# Altium PCB Half Bridge.PcbDoc
Units mm, origin at the board's own origin, x right, y up, seen from the top; angles counter-clockwise.
Board outline 30 x 30 mm, 2 copper layers (Top Layer, Bottom Layer), stack 1.5 mm thick; 8 components, 10 nets, 41 pads, 19 vias.
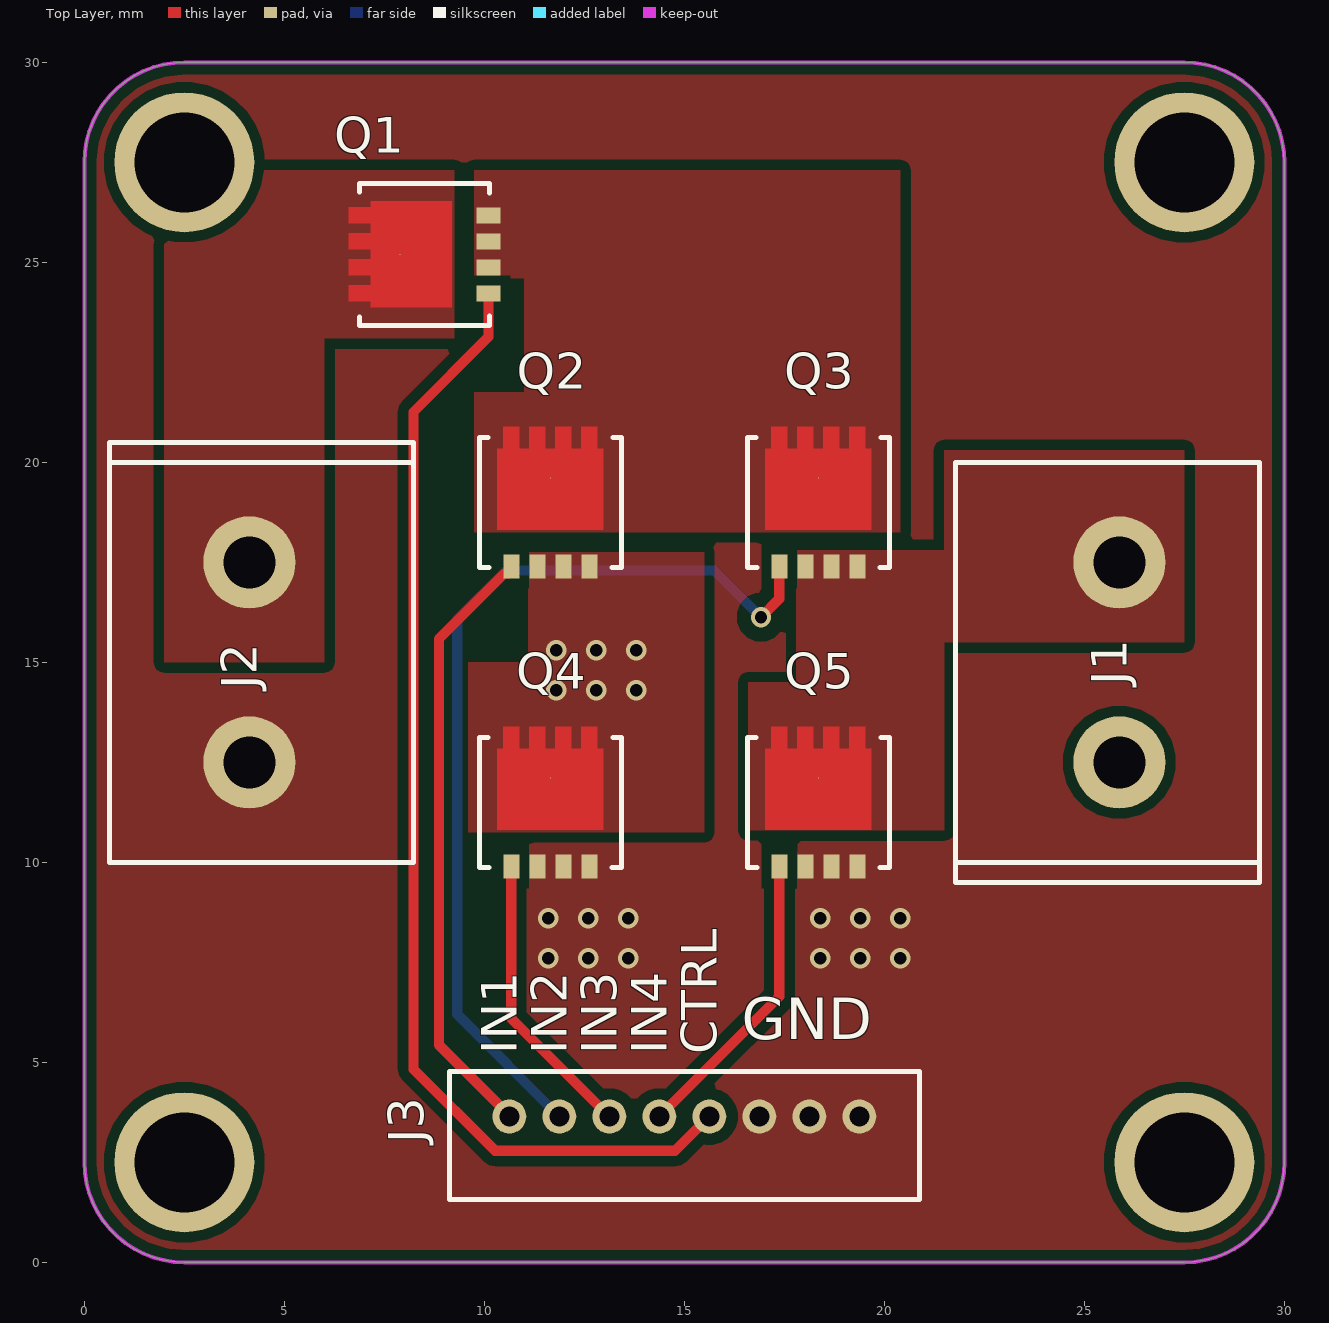
[diagram p0: Top Layer view]
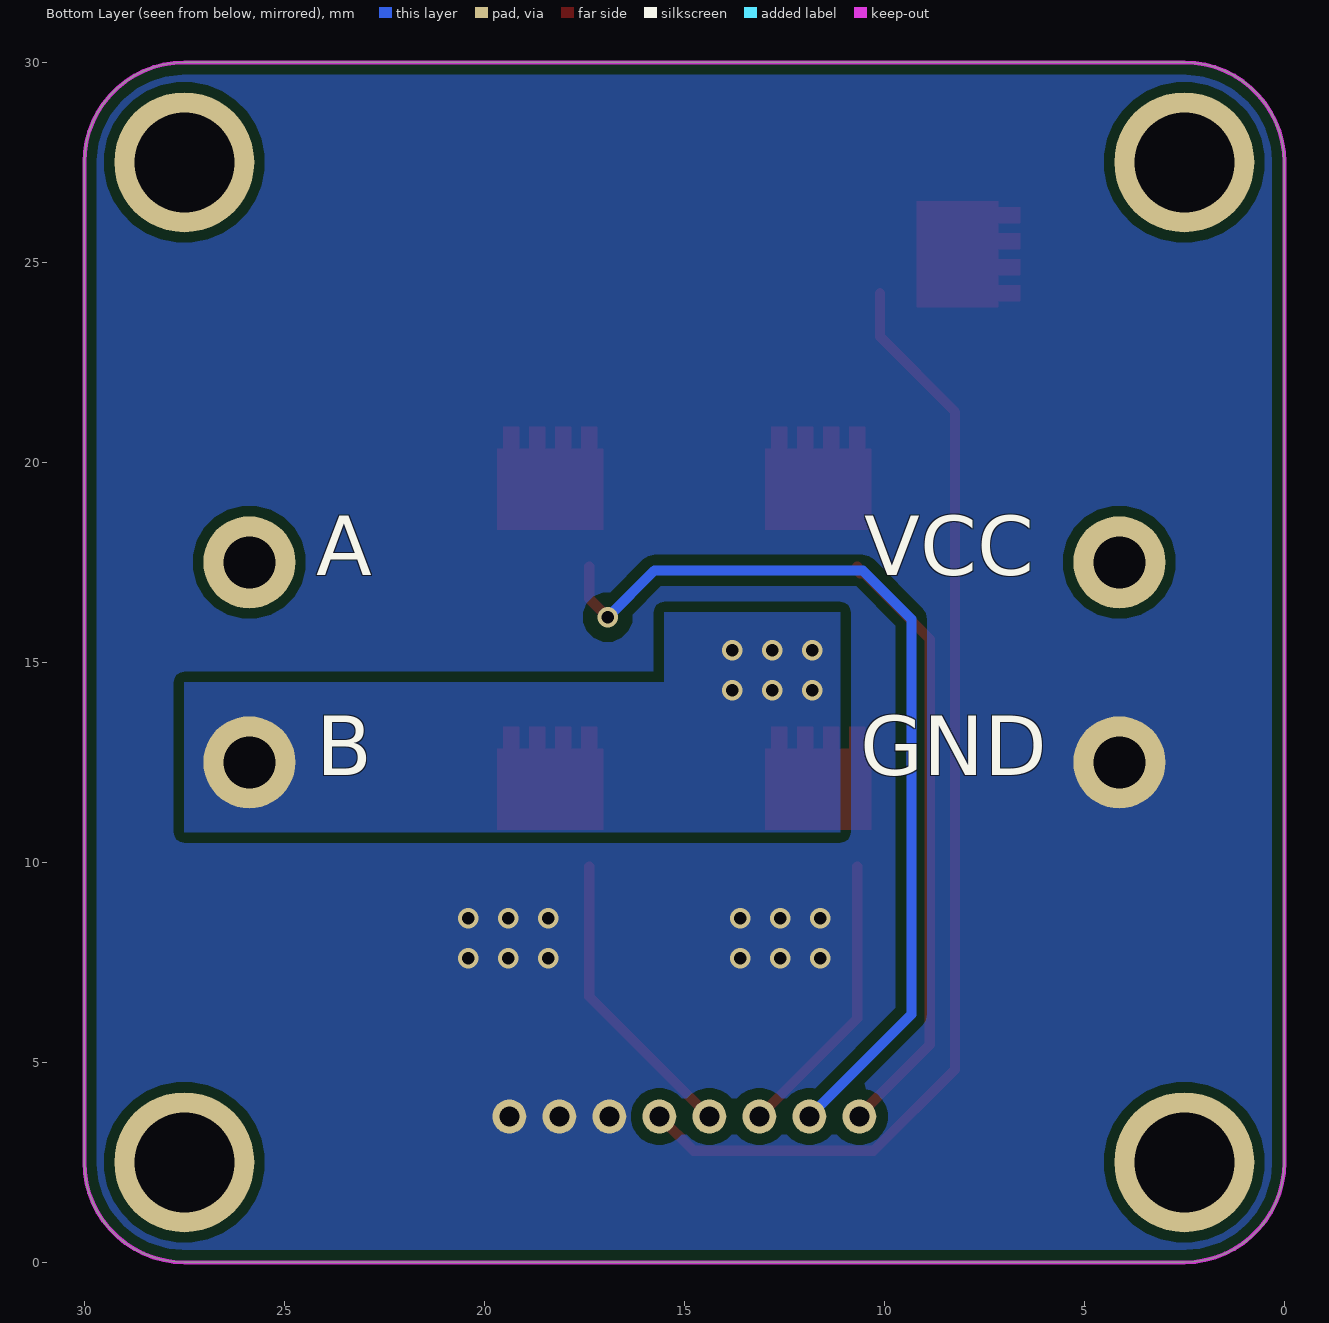
[diagram p1: Bottom Layer view, seen from below]
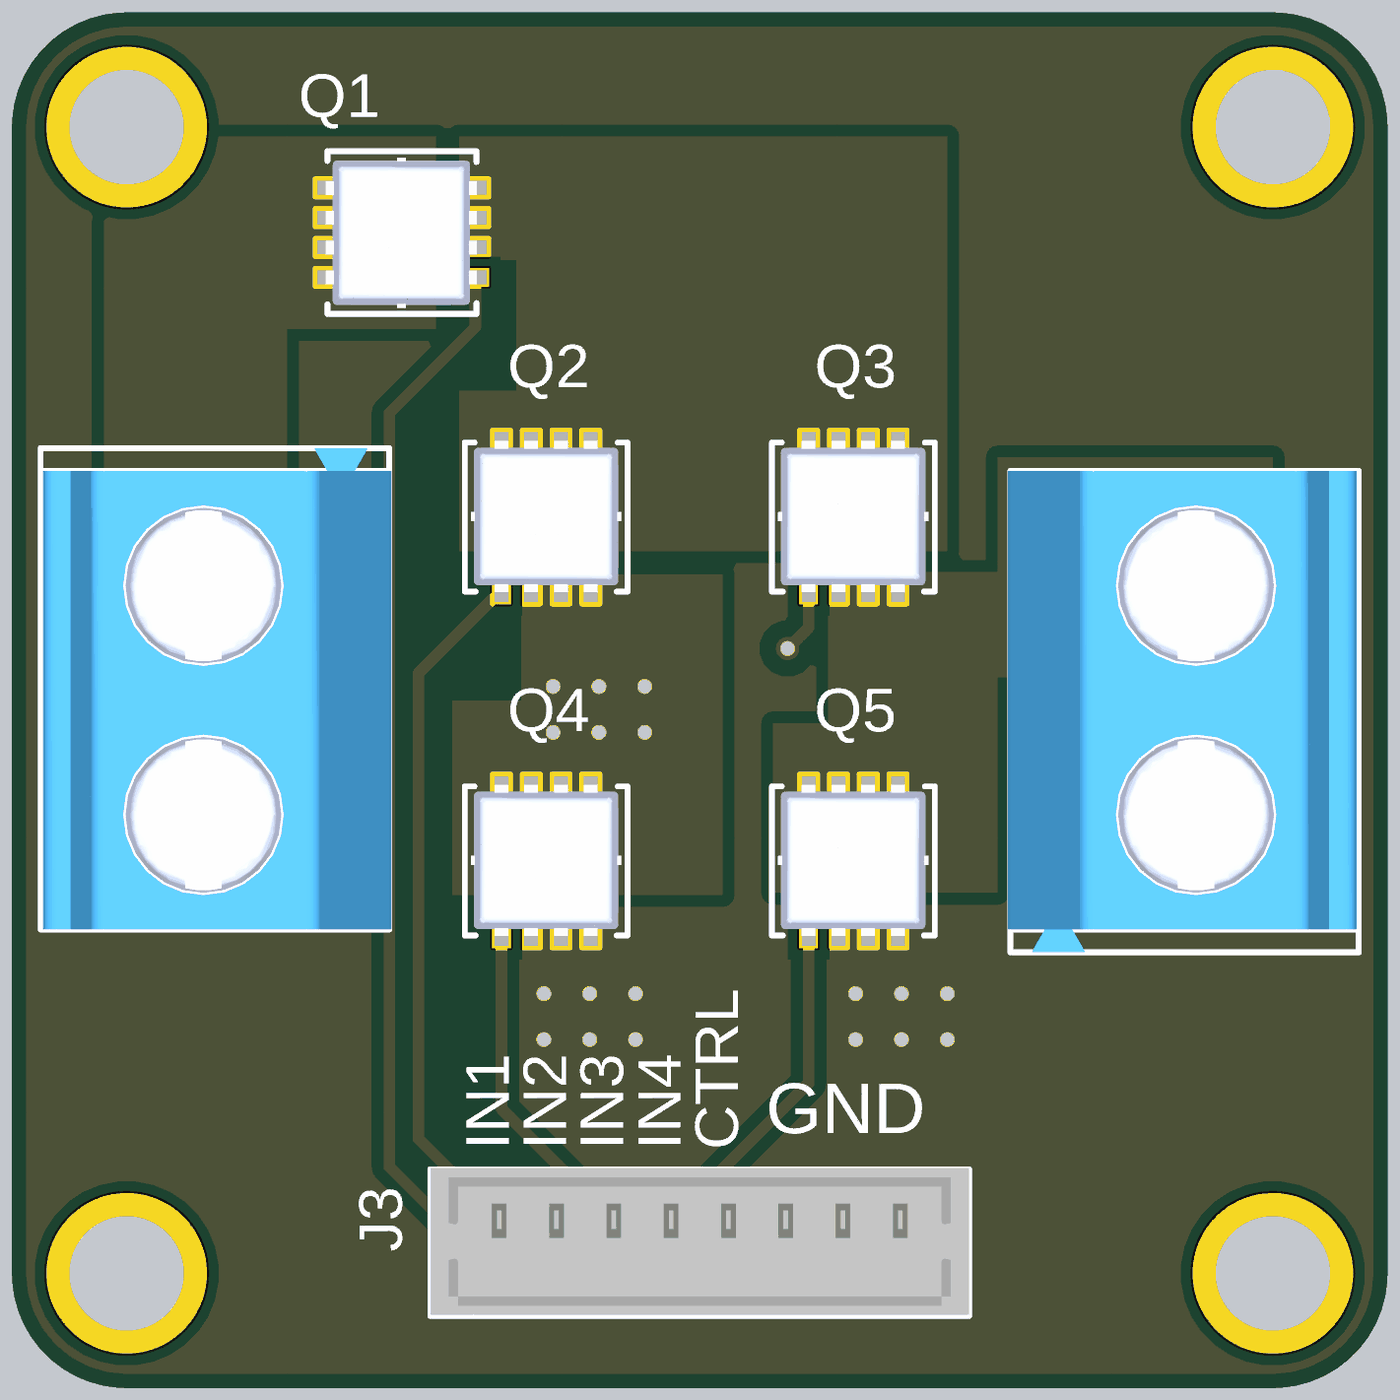
[diagram p2: 3D render of the assembled board from above, using the file's embedded part models]

## Layer stack, top to bottom
Top Solder: solder mask 0.0305, SM-001, Dk 3.8
Top Layer: signal copper 0.035
Dielectric 1: core 1.43, Core-043, Dk 4.6
Bottom Layer: signal copper 0.035
Bottom Solder: solder mask 0.0305, SM-001, Dk 3.8

## Board outline
0,2.5 0,27.5 cw(c2.5,27.5) 2.5,30 27.5,30 cw(c27.5,27.5) 30,27.5 30,2.5 cw(c27.5,2.5) 27.5,0 2.5,0 cw(c2.5,2.5)

## Design rules (kind name [scope] priority, off if disabled: settings)
BoardOutlineClearance [All] p1: gap=0.305 ignorepadtopadclearanceinfootprint=FALSE except(0: Arc-SplitContinuation Track-SplitContinuation SMDPad-SplitContinuation THPad-SplitContinuation Via-SplitContinuation Fill-SplitContinuation Poly-SplitContinuation Region-SplitContinuation Text-SplitContinuation)
Clearance [All] p1: gap=0.254 ignorepadtopadclearanceinfootprint=TRUE except(0.127: Arc-Arc Arc-Track Arc-SMDPad Track-Track Track-SMDPad; 0.152: Arc-Text Track-Text SMDPad-SMDPad SMDPad-Text THPad-Text Via-Text Fill-Text Poly-Text Region-Text Text-Text; 0.203: Arc-Via Track-Via SMDPad-Via Via-Via; 0.305: Arc-THPad Track-THPad SMDPad-THPad; 0.457: Arc-Hole Track-Hole SMDPad-Hole THPad-THPad THPad-Via THPad-Hole Via-Hole Fill-Hole Poly-Hole Region-Hole Text-Hole)
ComponentClearance [All] p1: gap=0.254 collisioncheckmode=3 verticalgap=0.254 showdistances=TRUE checkcomponentboundary=TRUE
HoleSize [All] p1: absolutevalues=TRUE maxlimit=6.299 minlimit=0.305 maxpercent=80.000 minpercent=20.000
HoleToHoleClearance [All] p1: gap=0.457 allowstackedmicrovias=TRUE
MinimumSolderMaskSliver [All] p1: minsoldermaskwidth=0.076
PolygonConnect [All] p1: connectstyle=Direct reliefconductorwidth=0.254 reliefentries=4 polygonreliefangle="45 Angle" airgapwidth=0.254
RoutingVias [All] p1: holewidth=0.381 width=0.584 viastyle="Through Hole" minholewidth=0.305 minwidth=0.508 maxholewidth=0.61 maxwidth=0.864
SilkToSilkClearance [All] p1: silktosilkclearance=0.152
SilkToSolderMaskClearance SilkscreenOverComponentPads [IsPad] p1: minsilkscreentomaskgap=0.152 clearancetoexposedcopper=FALSE
SolderMaskExpansion [All] p1: expansion=0.051 istentingtop=FALSE
UnRoutedNet [All] p1: checkbadconnections=TRUE
UnpouredPolygon [All] p1: allowunpoured=TRUE allowshelved=TRUE
Width [All] p1: maxlimit=25.4 minlimit=0.152 preferedwidth=0.203
22 further rules are at their usual default settings.

## Components (designator, comment, footprint, x,y, rotation, side; value= is the part's Value field where it differs from the comment)
J1 "TB002-500-02BE" TB002-500-02BE 25.875,15 r90 top locked
J2 "TB002-500-02BE" TB002-500-02BE 4.125,15 r270 top locked
J3 "530470810" 530470810 15,3.645 r0 top locked
Q1 "PXN017-30QL" NEXPERIA-MLPAK33 9,25.2 r90 top locked
Q2 "PXN017-30QL" NEXPERIA-MLPAK33 11.65,18.5 r0 top locked
Q3 "PXN017-30QL" NEXPERIA-MLPAK33 18.35,18.5 r0 top locked
Q4 "PXN017-30QL" NEXPERIA-MLPAK33 11.65,11 r0 top locked
Q5 "PXN017-30QL" NEXPERIA-MLPAK33 18.35,11 r0 top locked

## Footprints (in the part's own frame and the unit in brackets; to place one, negate y for a bottom-side part, rotate by r counter-clockwise, add the part's x,y. Pads: shape width x height; smd on the part's side, far side on the other; paste and mask are expansions set on the pad)
530470810 [mm] "Connector Header Through Hole 8 position 0.049\" (1.25mm)"
  round 0.85 hole 0.5: 1(-4.375,0) 2(-3.125,0) 3(-1.875,0) 4(-0.625,0) 5(0.625,0) 6(1.875,0) 7(3.125,0) 8(4.375,0)
  silkscreen extent -5.87,-2.07 5.88,1.12, body extent -5.87,-2.05 5.87,1.15, height 4.22
NEXPERIA-MLPAK33 [mm] "SOT8002-1"
  round 0.025 smd paste-2539.97 mask+0.05: D(0,1.105)
  rect 0.4x0.6 smd paste-0.05 mask+0.05: G(-0.975,-1.105) S(-0.325,-1.105) S(0.325,-1.105) S(0.975,-1.105)
  Top Layer region: -1.325,1.845 -1.175,1.845 -1.175,2.395 -0.775,2.395 -0.775,1.845 -0.525,1.845 -0.525,2.395 -0.125,2.395 -0.125,1.845 0.125,1.845 0.125,2.395 0.525,2.395 0.525,1.845 0.775,1.845 0.775,2.395 1.175,2.395 1.175,1.845 1.325,1.845 1.325,-0.185 -1.325,-0.185
  silkscreen extent -1.78,-1.13 1.78,2.12, body extent -1.64,-1.14 1.64,2.16, height 0.83
TB002-500-02BE [mm] "2 Position Wire to Board Terminal Block Horizontal with Board 0.197\" (5.00mm) Through Hole"
  round 2.3 hole 1.3: 1(-2.5,0) 2(2.5,0)
  silkscreen extent -5.5,-3.5 5,4.1, body extent -5.5,-3.45 5,4.15, height 10.02

## Part data
J1 J2: "2 Position Wire to Board Terminal Block Horizontal with Board 0.197\" (5.00mm) Through Hole", Color=Blue, Current Rating=15A, Manufacturer 1="Same Sky", Max Operating Temperature 1=105°C, Min Operating Temperature 1=-40°C, Supplier Part Number 1=102-6145-ND, Voltage Rating=300V, Approvals="CE, EN, IEC, UL, cUL", Category 1="Terminal Blocks", ComponentLink1Description=https://datasheet.octopart.com:443/TB002-500-02BE-Same-Sky-datasheet-181920249.pdf?src-supplier=Same+Sky, ComponentLink1URL=https://datasheet.octopart.com:443/TB002-500-02BE-Same-Sky-datasheet-181920249.pdf?src-supplier=Same+Sky, Description 1="2~24 Poles, Screw Type, Horizontal, 5.0 Pitch, 22~12 (AWG), Terminal Block Connector", Export Control Classification Number (ECCN) Code=EAR99, Harmonized Tariff Schedule (HTS) Code=8536.90.40.00, Height=10mm, Introduction Date=2024-10-09, Lifecycle Status=Production, Manufacturer Part Number 1=TB002-500-02BE, Mount 1=Screw, Number of Contacts=2, Number of Levels=1, Number of Pins 1=2, Number of Rows=1, Orientation=Horizontal, Pitch=5mm, REACH SVHC=Affected, RoHS 1=Compliant, Supplier 1=DigiKey, Width=7.6mm, Wire/Cable Gauge=12AWG
J3: "Connector Header Through Hole 8 position 0.049\" (1.25mm)", Case/Package 1=0810, Color=Natural, Contact Resistance=20mΩ, Current Rating=1A, Dielectric Material=Polyamide, Flammability Rating="UL94 V-0", Insulation Resistance=100MΩ, Manufacturer 1=Molex, Manufacturer Lifecycle Status=ACTIVE, Manufacturer Part Number 1=53047-0810, Max Operating Temperature 1=85°C, Min Operating Temperature 1=-40°C, Supplier Part Number 1=C240845, Voltage Rating=125V, Category 1="Headers and Wire Housings", China RoHS=Compliant, ComponentLink1Description=https://datasheet.octopart.com:443/53047-0810-Molex-datasheet-138898128.pdf?src-supplier=Sager+Electronics, ComponentLink1URL=https://datasheet.octopart.com:443/53047-0810-Molex-datasheet-138898128.pdf?src-supplier=Sager+Electronics, ComponentLink2Description=https://datasheet.octopart.com:443/53047-0810-Molex-datasheet-13785974.pdf?src-supplier=Sager+Electronics, ComponentLink2URL=https://datasheet.octopart.com:443/53047-0810-Molex-datasheet-13785974.pdf?src-supplier=Sager+Electronics, ComponentLink3Description=https://sigma.octopart.com:443/138898116/technical_drawing/Molex-53047-0810.pdf?src-supplier=IHS, ComponentLink3URL=https://sigma.octopart.com:443/138898116/technical_drawing/Molex-53047-0810.pdf?src-supplier=IHS, ComponentLink4Description=https://datasheet.octopart.com:443/530470810-Molex-datasheet-8334299.pdf?src-supplier=Molex, ComponentLink4URL=https://datasheet.octopart.com:443/530470810-Molex-datasheet-8334299.pdf?src-supplier=Molex, ComponentLink5Description=https://datasheet.octopart.com:443/53047-0810-Molex-datasheet-38191.pdf?src-supplier=TME, ComponentLink5URL=https://datasheet.octopart.com:443/53047-0810-Molex-datasheet-38191.pdf?src-supplier=TME, ComponentLink6Description=https://datasheet.octopart.com:443/53047-0810-Molex-datasheet-154755961.pdf?src-supplier=Master+Electronics, ComponentLink6URL=https://datasheet.octopart.com:443/53047-0810-Molex-datasheet-154755961.pdf?src-supplier=Master+Electronics, ComponentLink7Description=https://datasheet.octopart.com:443/53047-0810-Molex-datasheet-101583379.pdf?src-supplier=Farnell, ComponentLink7URL=https://datasheet.octopart.com:443/53047-0810-Molex-datasheet-101583379.pdf?src-supplier=Farnell, ComponentLink8Description=https://datasheet.octopart.com:443/53047-0810-Molex-datasheet-14711287.pdf?src-supplier=Farnell, ComponentLink8URL=https://datasheet.octopart.com:443/53047-0810-Molex-datasheet-14711287.pdf?src-supplier=Farnell, ComponentLink9Description=https://datasheet.octopart.com:443/53047-0810-Molex-datasheet-5313088.pdf?src-supplier=Farnell, ComponentLink9URL=https://datasheet.octopart.com:443/53047-0810-Molex-datasheet-5313088.pdf?src-supplier=Farnell, ComponentLink10Description=https://datasheet.octopart.com:443/53047-0810-Molex-datasheet-33003857.pdf?src-supplier=Electro+Sonic, ComponentLink10URL=https://datasheet.octopart.com:443/53047-0810-Molex-datasheet-33003857.pdf?src-supplier=Electro+Sonic, ComponentLink11Description=https://datasheet.octopart.com:443/53047-0810-Molex-datasheet-62105410.pdf?src-supplier=Electro+Sonic, ComponentLink11URL=https://datasheet.octopart.com:443/53047-0810-Molex-datasheet-62105410.pdf?src-supplier=Electro+Sonic, ComponentLink12Description=https://datasheet.octopart.com:443/53047-0810-Molex-datasheet-23710544.pdf?src-supplier=Electro+Sonic, ComponentLink12URL=https://datasheet.octopart.com:443/53047-0810-Molex-datasheet-23710544.pdf?src-supplier=Electro+Sonic, ComponentLink13Description=https://datasheet.octopart.com:443/53047-0810-Molex-datasheet-140186535.pdf?src-supplier=RS+(Formerly+Allied+Electronics), ComponentLink13URL=https://datasheet.octopart.com:443/53047-0810-Molex-datasheet-140186535.pdf?src-supplier=RS+(Formerly+Allied+Electronics), ComponentLink14Description=https://datasheet.octopart.com:443/53047-0810-Molex-datasheet-120153815.pdf?src-supplier=RS+(Formerly+Allied+Electronics), ComponentLink14URL=https://datasheet.octopart.com:443/53047-0810-Molex-datasheet-120153815.pdf?src-supplier=RS+(Formerly+Allied+Electronics), ComponentLink15Description=https://datasheet.octopart.com:443/530470810-Molex-datasheet-137316104.pdf?src-supplier=Future+Electronics, ComponentLink15URL=https://datasheet.octopart.com:443/530470810-Molex-datasheet-137316104.pdf?src-supplier=Future+Electronics, ComponentLink16Description=https://datasheet.octopart.com:443/53047-0810-Molex-datasheet-33003856.pdf?src-supplier=Newark, ComponentLink16URL=https://datasheet.octopart.com:443/53047-0810-Molex-datasheet-33003856.pdf?src-supplier=Newark, ComponentLink17Description=https://datasheet.octopart.com:443/53047-0810-Molex-datasheet-21208624.pdf?src-supplier=Newark, ComponentLink17URL=https://datasheet.octopart.com:443/53047-0810-Molex-datasheet-21208624.pdf?src-supplier=Newark, ComponentLink18Description=https://datasheet.octopart.com:443/53047-0810-Molex-datasheet-17741837.pdf?src-supplier=Jameco, ComponentLink18URL=https://datasheet.octopart.com:443/53047-0810-Molex-datasheet-17741837.pdf?src-supplier=Jameco, ComponentLink19Description=https://datasheet.octopart.com:443/53047-0810-Molex-datasheet-144844.pdf?src-supplier=DigiKey, ComponentLink19URL=https://datasheet.octopart.com:443/53047-0810-Molex-datasheet-144844.pdf?src-supplier=DigiKey, ComponentLink20Description=https://datasheet.octopart.com:443/53047-0810-Molex-datasheet-100429.pdf?src-supplier=Mouser, ComponentLink20URL=https://datasheet.octopart.com:443/53047-0810-Molex-datasheet-100429.pdf?src-supplier=Mouser, ComponentLink21Description=http://sigma.octopart.com:80/16412934/rohs_statement/Molex-53047-0810.pdf?src-supplier=Compliance+Statements, ComponentLink21URL=http://sigma.octopart.com:80/16412934/rohs_statement/Molex-53047-0810.pdf?src-supplier=Compliance+Statements, ComponentLink22Description=http://sigma.octopart.com:80/reach_statement/Molex-company-74.pdf?src-supplier=Compliance+Statements, ComponentLink22URL=http://sigma.octopart.com:80/reach_statement/Molex-company-74.pdf?src-supplier=Compliance+Statements, ComponentLink23Description=http://sigma.octopart.com:80/rohs_statement/Molex-company-73.pdf?src-supplier=Compliance+Statements, ComponentLink23URL=http://sigma.octopart.com:80/rohs_statement/Molex-company-73.pdf?src-supplier=Compliance+Statements, ComponentLink24Description=http://sigma.octopart.com:80/conflict_mineral_statement/Molex-company-72.pdf?src-supplier=Compliance+Statements, ComponentLink24URL=http://sigma.octopart.com:80/conflict_mineral_statement/Molex-company-72.pdf?src-supplier=Compliance+Statements, Contact Gender=Male, Contact Material=Tin, Contact Plating=Tin, Country of Origin=MX, Description 1="Conn Shrouded Header (4 Sides) HDR 8 POS 1.25mm Solder ST Top Entry Thru-Hole PicoBlade Tray", Gender=Male, Glow Wire Compliant=Non-compliant, Height=4.4mm, Housing Color=Natural, Housing Material=Polyamide, Lead Free 1="Lead Free", Lead Pitch=1.25mm, Lifecycle Status=Production, Mount 1="Through Hole", Number of Circuits=7, Number of Contacts=8, Number of Pins 1=8, Number of Positions=8, Number of Rows=1, Orientation=Vertical, Pitch=1.25mm, Plating=Tin, Radiation Hardening=No, REACH SVHC=Yes, RoHS 1=Compliant, Schedule B="8536694040, 8536694040|8536694040|8536694040|8536694040|8536694040", Supplier 1=LCSC, Terminal Pitch=1.25mm, Termination="Through Hole", Voltage Rating (AC)=125V, Voltage Rating (DC)=125V
Q1 Q2 Q3 Q4 Q5: "N-Channel 30 V 7.9A (Ta), 20A (Tc) 1.7W (Ta), 10.9W (Tc) Surface Mount MLPAK33", Drain Current - Continuous (Id)=12A, Drain Current - Pulsed (Id)=163A, Drain to Source Voltage (Vdss)=30V, Gate−Source Voltage(Vgss)=±20V, Input Capacitance (Ciss) (Max) @ Vds="350 pF @ 15 V", Manufacturer=Nexperia, Operating Temperature="-55°C ~ 150°C (TJ)", Power Dissipation (Max)="1.7W (Ta)", Ratings=-, Supplier Part Number 1=1727-PXN017-30QLJCT-ND, Category="Power MOSFET", Channel Polarity=N-Channel, Configuration=Single, Datasheet=https://assets.nexperia.com/documents/data-sheet/PXN017-30QL.pdf, Eco Plan=RoHS, Gate Charge (Qg) (Max) @ Vgs="7.7 nC @ 10 V", Gate Level=Logic, Rds On (Max) @ Id, Vgs="17.4mOhm @ 7.9A, 10V", Series=TrenchMOS, Supplier 1=Digi-Key, Vgs(th) (Max) @ Id="2.2V @ 250µA", Simulation ModelName=PXN017-30QL, Simulation ModelText=".SUBCKT PXN017-30QL D G S /  / * Package impedance / LD D 5 200.0p / RLD2 D 5 502.7m / RLD1 5 4 20.80u / LG G 1 915.4p / RLG G 1 2.301 / LS S 8 665.7p / RLS2 S 8 1.673 / RLS1 8 7 3.314m /  / * Drain,gate and source resistances / RD 3 4 10.01m TC= 3.324m,1.004n / RG 1 2 3.000 / RS 6 7 1.000u /  / * Body Diode / RBD 9 4 6.050m TC= 4.000m,23.00u / DBD 7 9 D_DBD / RDS 7 4 12.15G TC= -5.000m /  / * Internal MOS / M1 3 2 6 6 MINT /  / * Gate leakage and gate capacitance / RGS 2 6 174.4G / CGS 2 6 329.0p /  / * CGD / C11 11 12 1E-12 / V11 11 0 0Vdc / G11 3 2 VALUE {V(13,0)*I(V11)} / E11 12 0 3 2 1 / E12 13 0 TABLE {V(12)} / + (-10.0,135.8) / + (-2.5,135.8) / + (0.1,38.98) / + (0.2,73.41) / + (0.5,64.49) / + (1.0,56.29) / + (2.0,46.47) / + (3.0,40.02) / + (4.0,35.16) / + (5.0,31.26) / + (6.0,28.37) / + (8.0,25.04) / + (10.0,23.5) / + (12.0,22.66) / + (15.0,21.94) / + (20.0,21.28) / + (24.0,20.94) /  / .MODEL MINT NMOS Vto= 2.205 Kp= 89.21 Nfs= 479.4G Eta= 0.000 / + Level= 3 Gamma= 0.000 Phi= 600.0m Is= 1.000E-24 UO= 600.0 / + Js= 0.000 Pb= 800.0m Cj= 0.000 Cjsw= 0.000 Cgso= 0.000 Cgdo= 0.000 Cgbo= 0.000 / + Tox= 100.0n Xj= 0.000 / + Vmax= 735.3 /  / .MODEL D_DBD D Bv= 33.12 Ibv= 250.0u Rs= 1.000u Is= 422.9f / + N= 1.000 M= 311.3m VJ= 320.5m Fc= 500.0m Cjo= 627.0p Tt= 18.50n /  / .ENDS PXN017-30QL", Simulation PortMap=(D:1),(G:2),(S:3)

## Free pads (board coordinates)
  round 3.5 hole 2.5: NC(2.5,2.5) NC(2.5,27.5) NC(27.5,2.5) NC(27.5,27.5)

## Via types
v1: diameter 0.508, hole 0.305, Top Layer to Bottom Layer, tented both sides, 19 vias

## Nets (pads, with @x,y where several pads share a name; then routed paths per layer and width w, separated by ;. In a path a pad name is that pad's centre, name@x,y a point inside that pad or via, vN(x,y) a via of type N, cw(c..) or ccw(c..) an arc to the next point about the centre after c; other vN are vias at no path point)
CTRL: J3.5 Q1.G | length 28.8
  Top Layer w0.254: Q1.G 10.105,23.135 8.23,21.26 8.23,4.829 10.27,2.788 14.768,2.788 J3.5
GND: J2.2 J3.6 J3.7 J3.8 Q4.S Q5.S
  other v1: 11.6,7.6 12.6,7.6 13.6,7.6 18.4,7.6 19.4,7.6 20.4,7.6 11.6,8.6 12.6,8.6 13.6,8.6 18.4,8.6 19.4,8.6 20.4,8.6
INPUT1: J3.1 Q2.G | length 15.3
  Top Layer w0.254: J3.1 10.625,3.677 8.865,5.437 8.865,15.585 10.502,17.222 10.602,17.222 10.675,17.295 Q2.G
INPUT2: J3.2 Q3.G | length 23.5
  Top Layer w0.254: v1(16.916,16.129) 17.375,16.588 Q3.G
  Bottom Layer w0.254: J3.2 9.322,6.198 9.322,16.078 10.541,17.297 15.748,17.297 v1(16.916,16.129)
INPUT3: J3.3 Q4.G | length 7.3
  Top Layer w0.254: Q4.G 10.675,6.095 J3.3
INPUT4: J3.4 Q5.G | length 7.5
  Top Layer w0.254: J3.4 17.375,6.645 Q5.G
MID-A: J1.1 Q2.S Q4.D
  other v1: 11.8,14.3 12.8,14.3 13.8,14.3 11.8,15.3 12.8,15.3 13.8,15.3
MID-B: J1.2 Q3.S Q5.D
NetQ1_S: Q1.S Q2.D Q3.D
VCC: J2.1 Q1.D

## Polygon pours and split planes (outlines as drawn)
GND on Top Layer "NONET_L-01_P-001" (solid, remove dead copper, pour order 8): 0,0 30,0 30,30 0,30
GND on Top Layer "GND_L-01_P-002" (solid, remove dead copper, pour order 5): 17.8,10.25 21.25,10.25 21.25,7 17.8,7
GND on Top Layer "GND_L-01_P-001" (solid, remove dead copper, pour order 4): 11.1,10.25 14.75,10.25 14.75,7 11.1,7
NetQ1_S on Top Layer "NetQ1_S_L-01_P-001" (solid, remove dead copper, pour order 1): 9.75,27.3 9.75,24.6 11,24.6 11,21.75 9.75,21.75 9.75,18.25 20.4,18.25 20.4,27.3
MID-A on Top Layer "NONET_L-01_P-001" (solid, remove dead copper, pour order 3): 11.1,17.75 15.5,17.75 15.5,16.5 15.5,10.75 9.6,10.75 9.6,15 11.1,15
MID-B on Top Layer "MID-B_L-01_P-001" (solid, remove dead copper, pour order 2): 17.8,17.8 17.8,14.5 16.6,14.5 16.6,10.8 21.5,10.8 21.5,15.5 27.5,15.5 27.5,20.3 21.5,20.3 21.5,17.8
VCC on Top Layer "VCC_L-01_P-001" (solid, remove dead copper, pour order 0): 2,15 6,15 6,23.1 9.25,23.1 9.25,27.3 2,27.3
GND on Bottom Layer "NONET_L-01_P-001" (solid, remove dead copper, pour order 7): 0,0 30,0 30,30 0,30
MID-A on Bottom Layer "NONET_L-01_P-001" (solid, remove dead copper, pour order 6): 11.1,16.25 15.5,16.25 15.5,14.5 27.5,14.5 27.5,10.75 11.1,10.75

## Keep-outs
Keep-Out Layer:
  the board outline again, w0.1

## Silkscreen, mask and mechanical layers (free items; w line width, h text height)
Top Overlay:
  text "GND" at 16.441,5.231 h1.78
  text "IN1" at 11.115,5.2 h1.52 r90
  text "IN2" at 12.365,5.2 h1.52 r90
  text "IN3" at 13.606,5.2 h1.52 r90
  text "IN4" at 14.863,5.2 h1.52 r90
  text "CTRL" at 16.113,5.2 h1.52 r90
Bottom Overlay:
  text "VCC" at 10.497,16.687 h2.54
  text "A" at 24.2,16.687 h2.54
  text "GND" at 10.607,11.687 h2.54
  text "B" at 24.2,11.687 h2.54